# Altium PCB NB3000XN.PcbDoc (part 44 of 71)
Units mil, origin at the board's own origin, x right, y up, seen from the top; angles counter-clockwise.
Board outline 9527.56 x 6929.77 mil, 6 copper layers (Top Layer, GND+SHIELD, MidLayer1, MidLayer2, P2 - 3V3+5V0, Bottom Layer), stack 62.375 mil thick; 832 components, 1027 nets, 4655 pads, 4981 vias.
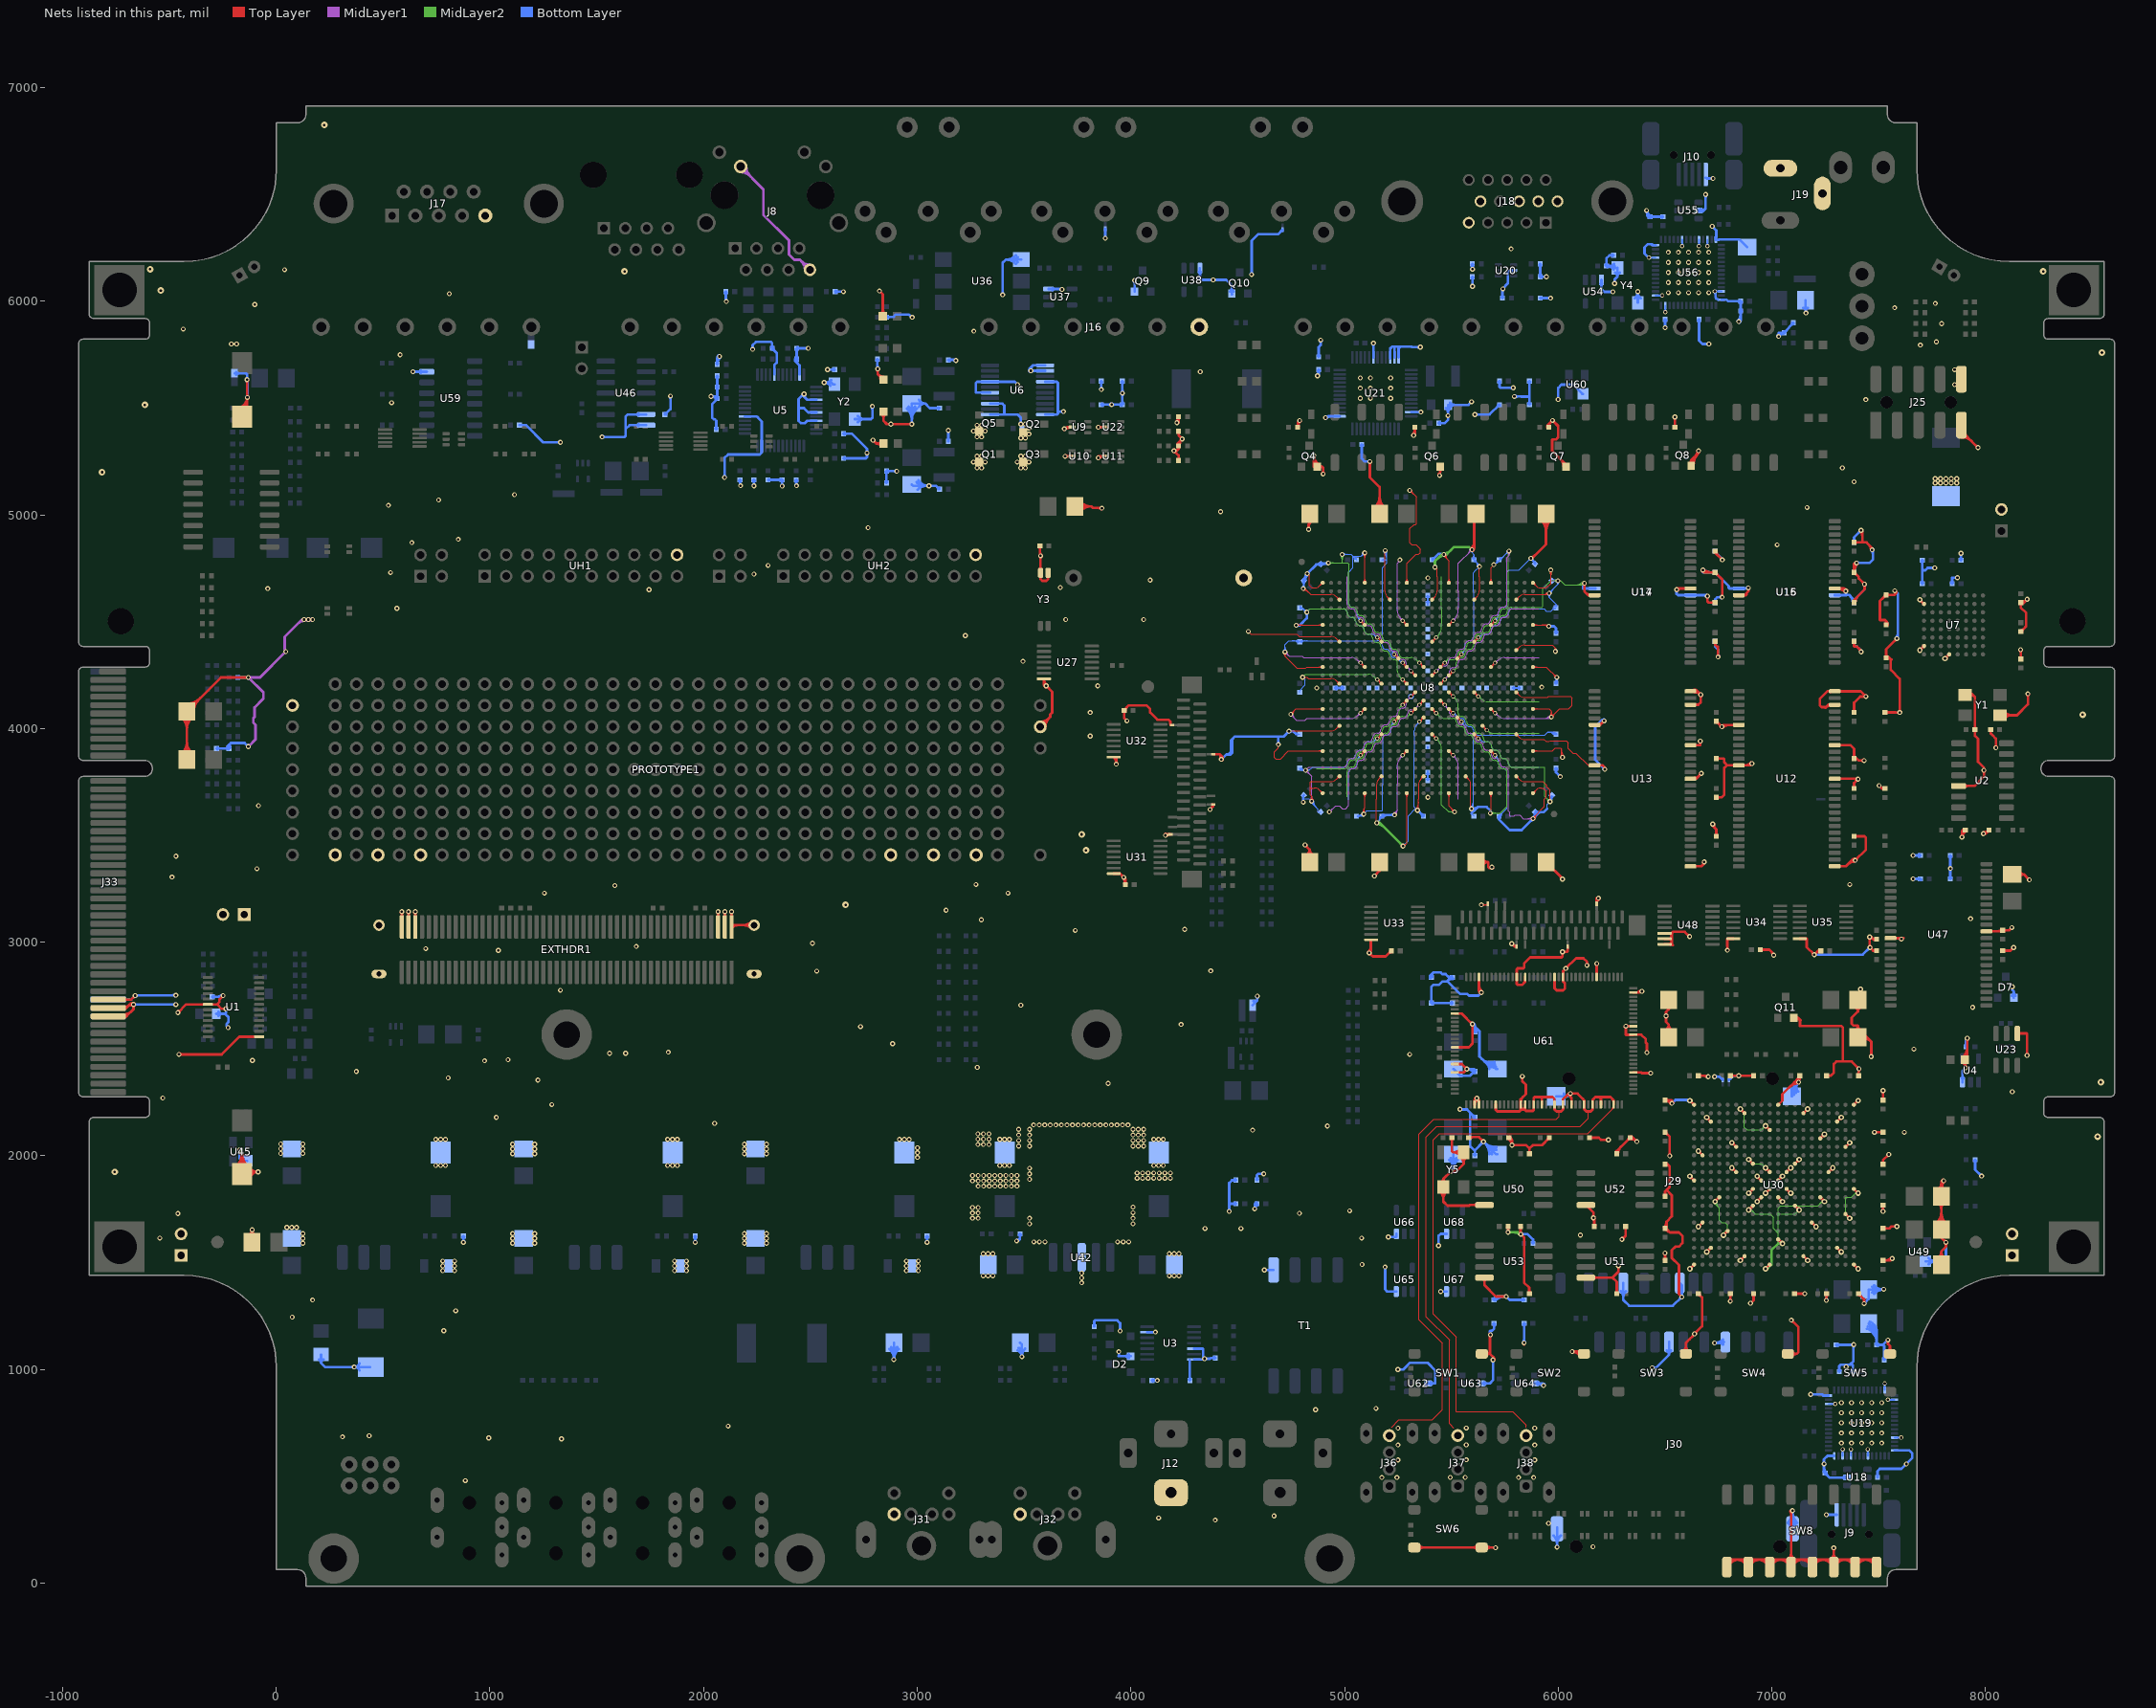
[diagram p48: the nets of this part, all layers, seen from the top]

## Via types
v1: diameter 23, hole 11.81, Top Layer to Bottom Layer, 3672 vias
v2: diameter 26, hole 11.81, Top Layer to Bottom Layer, 461 vias
v3: diameter 19, hole 11.81, Top Layer to Bottom Layer, tented both sides, 396 vias
v4: diameter 23.62, hole 11.81, Top Layer to Bottom Layer, 288 vias
v5: diameter 20, hole 11.81, Top Layer to Bottom Layer, 91 vias
v6: diameter 23, hole 11.81, Top Layer to Bottom Layer, tented both sides, 50 vias
v7: diameter 31, hole 11.81, Top Layer to Bottom Layer, 15 vias
v8: diameter 27.56, hole 11.81, Top Layer to Bottom Layer, tented both sides, 4 vias
v9: diameter 29, hole 11.81, Top Layer to Bottom Layer, 3 vias
v10: diameter 21, hole 11.81, Top Layer to Bottom Layer, 1 vias

## Nets (pads, with @x,y where several pads share a name; then routed paths per layer and width w, separated by ;. In a path a pad name is that pad's centre, name@x,y a point inside that pad or via, vN(x,y) a via of type N, cw(c..) or ccw(c..) an arc to the next point about the centre after c; other vN are vias at no path point) (continued)
GND: (continued)
  Bottom Layer w4: v1@4714.47,4365.09 ccw(c4698.26,4381.31) 4721.19,4381.31 ccw(c4744.13,4381.31) v1@4727.91,4365.09 ; v1@4717.3,4362.26 ccw(c4707.91,4371.65) 4721.19,4371.65 ccw(c4734.47,4371.65) v1@4725.08,4362.26 ; v1(4721.19,4358.37) 4721.19,4391.95 4739.86,4410.62 C320.2@4790,4410.62 ; 4754.08,4410.62 cw(c4754.08,4369.63) C320.2@4783.06,4398.61 ; 4763.73,4410.62 cw(c4763.73,4379.28) C320.2@4785.89,4401.44 ; 4765.19,3982.78 4765.19,3983.04 ; 4773.39,4410.62 cw(c4773.39,4388.94) C320.2@4788.72,4404.27 ; C320.2@4778.55,4410.62 ccw(c4778.55,4417) C320.2@4783.06,4412.49 ; C323.2@4781.37,3969.77 ccw(c4773.52,3965.52) 4773.52,3974.45 ; C323.2@4781.37,3979.12 cw(c4773.52,3983.38) 4773.52,3974.45 ; C322.2@4787.93,3814.28 ccw(c4800.95,3818.83) C322.2@4800.95,3805.04 ; C322.2@4790,3815 C322.2@4799.96,3805.04 ; C323.2@4790,3974.45 4773.52,3974.45 ; C335.2@4790,4169.33 4790,4178.56 4815.19,4203.75 4815.19,4229.04 v1(4803.86,4240.37) ; C320.2@4790,4405.55 4795.07,4410.62 4860,4410.62 4870,4410.62 4938.04,4410.62 5153.78,4410.62 cw(c5153.78,4386.85) 5177.55,4386.85 ccw(c5193.15,4386.85) 5193.15,4371.25 cw(c5193.15,4347.48) 5216.92,4347.48 ; C304.2@4790,4559.19 cw(c4790,4513.22) v1@4822.51,4545.72 ; C304.2@4790,4563.19 cw(c4790,4526.87) v1@4815.68,4552.55 ; C304.2@4790,4565 4803.23,4565 v1(4823.52,4544.71) 4838.75,4559.93 4855.26,4559.93 4860,4559.93 4870,4559.93 4879.78,4559.93 4938.04,4559.93 4996.3,4559.93 cw(c4996.3,4544.33) 5011.9,4544.33 ccw(c5035.67,4544.33) 5035.67,4520.56 cw(c5035.67,4504.96) 5051.27,4504.96 ccw(c5075.04,4504.96) 5075.04,4481.19 cw(c5075.04,4465.59) 5090.64,4465.59 ccw(c5114.41,4465.59) 5114.41,4441.82 5122.53,4441.82 ; C304.2@4790,4567.19 cw(c4790,4540.53) 4808.85,4559.38 ; C304.2@4790,4571.19 cw(c4790,4554.19) 4802.02,4566.21 ; C320.2@4791.28,4404.27 cw(c4806.61,4388.94) 4806.61,4410.62 ; C322.2@4791.71,3815.6 ccw(c4806.58,3820.8) v1@4806.58,3805.04 ; C320.2@4794.11,4401.44 cw(c4816.27,4379.28) 4816.27,4410.62 ; C322.2@4795.49,3816.92 ccw(c4812.22,3822.77) v1@4812.22,3805.04 ; C320.2@4796.94,4398.61 cw(c4825.92,4369.63) 4825.92,4410.62 ; C320.2@4796.94,4412.49 ccw(c4801.45,4417) C320.2@4801.45,4410.62 ; C322.2@4799.26,3818.24 ccw(c4817.86,3824.74) v1(4817.86,3805.04) ; v1@4800.28,4661.72 ccw(c4777.82,4684.18) C310.2@4809.59,4684.18 ; C310.2@4802.65,4684.73 cw(c4785.9,4667.98) 4809.59,4667.98 cw(c4833.27,4667.99) C310.2@4816.53,4684.73 ; v1@4803.11,4658.89 ccw(c4787.47,4674.53) 4809.59,4674.53 ; C310.2@4805.48,4687.56 cw(c4795.56,4677.64) 4809.59,4677.64 cw(c4823.62,4677.64) C310.2@4813.7,4687.56 ; C327.2@4809.59,3688.33 4809.59,3672.04 4834.19,3672.04 v1(4846.19,3660.04) 4846.19,3651.71 4875.19,3622.71 4875.19,3609.59 C326.2@4888.33,3609.59 ; v1@4809.59,4659.98 C310.2@4809.59,4691.67 ; 4809.59,4671.69 ccw(c4823.69,4671.69) v1@4813.72,4661.72 ; v1@4809.99,3799.72 ccw(c4799.96,3792.93) C322.2@4799.96,3805.04 ; v1@4809.99,3810.36 cw(c4799.96,3817.15) C322.2@4799.96,3805.04 ; v1@4814.02,4544.71 ccw(c4791.09,4544.71) 4807.31,4560.93 ccw(c4823.52,4577.14) v1@4823.52,4554.21 ; v1@4817.52,4717.37 v1(4825.19,4725.04) ; v1@4817.86,3813.37 v1(4817.86,3805.04) ; v1@4818.02,4544.71 ccw(c4804.75,4544.71) 4814.14,4554.1 ccw(c4823.52,4563.49) v1@4823.52,4550.21 ; v1@4825.92,3800.02 cw(c4834.97,3794.38) 4834.97,3805.04 ; v1@4825.92,3810.07 ccw(c4834.97,3815.71) 4834.97,3805.04 ; v1@4847.69,3660.04 ccw(c4871.43,3660.04) 4854.64,3643.25 ; v1@4851.69,3660.04 ccw(c4885.09,3660.04) 4861.47,3636.43 ; v1@4855.69,3660.04 ccw(c4898.74,3660.04) 4868.3,3629.6 ; v1(4988.86,4815.04) 5031.3,4815.04 5040.19,4806.15 ; v1@4992.75,4811.15 cw(c5002.14,4801.76) 5002.14,4815.04 cw(c5002.14,4828.32) v1@4992.75,4818.93 ; v1@4995.57,4808.32 cw(c5011.79,4792.11) 5011.79,4815.04 cw(c5011.79,4837.98) v1@4995.57,4821.76 ; 5020.07,3670 5020.07,3679.78 5020.07,3738.04 5020.07,3796.3 cw(c5035.67,3796.3) 5035.67,3811.9 ccw(c5035.67,3835.67) 5059.44,3835.67 5059.44,3843.79 ; 5020.07,4700.22 5020.07,4670 ; 5020.07,4724.74 5020.07,4732.25 ; C308.2@5046.53,4790.26 ccw(c5024.87,4790.82) 5040.19,4806.15 ; C308.2@5050.53,4790.15 ccw(c5037.7,4790.49) 5046.77,4799.56 ccw(c5055.85,4808.64) C308.2@5056.19,4795.81 ; C308.2@5056.08,4799.81 cw(c5055.51,4821.47) 5040.19,4806.15 ; C308.2@5056.34,4790 5040.19,4806.15 ; 5059.44,4536.21 5059.44,4544.33 ccw(c5035.67,4544.33) 5035.67,4568.1 cw(c5035.67,4583.7) 5020.07,4583.7 5020.07,4641.96 5020.07,4670 ; 5059.49,3843.84 cw(c5083.21,3845.45) 5064.61,3860.24 ; 5059.49,4536.16 ccw(c5083.21,4534.55) 5064.61,4519.76 ; C331.2@5060.45,3585.89 cw(c5070.37,3575.97) 5070.37,3590 cw(c5070.37,3604.03) C331.2@5060.45,3594.11 ; C331.2@5063.28,3583.06 cw(c5080.02,3566.32) 5080.02,3590 cw(c5080.03,3613.69) C331.2@5063.28,3596.94 ; C331.2@5063.27,3590 ccw(c5063.27,3615.59) v1@5085.43,3602.79 ; v3@5067.65,3873.74 cw(c5049.82,3870.59) 5064.65,3860.21 cw(c5079.49,3849.82) v3@5076.34,3867.65 ; v3@5067.65,4506.26 ccw(c5049.82,4509.41) 5064.65,4519.79 ccw(c5079.49,4530.18) v3@5076.34,4512.35 ; 5070.2,3590 ccw(c5070.2,3611.59) v1@5088.89,3600.79 ; 5077.13,3590 ccw(c5077.13,3607.58) v1@5092.36,3598.79 ; v1@5081.96,3604.79 cw(c5056.34,3619.59) C331.2@5056.34,3590 5088.48,3590 5090.19,3591.71 v1(5090.19,3600.04) 5105.15,3615 5175,3615 5177.55,3617.55 5177.55,3655.26 5177.55,3660 5177.55,3670 5177.55,3679.78 5177.55,3738.04 5177.55,3953.78 cw(c5193.15,3953.78) 5193.15,3969.38 ccw(c5193.15,3993.15) 5216.92,3993.15 5216.92,4001.27 ; 5084.06,3590 ccw(c5084.06,3603.58) v1@5095.82,3596.79 ; v1@5085.02,4822.37 cw(c5062.09,4822.37) 5078.31,4806.16 cw(c5094.52,4789.94) v1@5094.52,4812.87 ; v1@5089.02,4822.37 cw(c5075.75,4822.37) 5085.14,4812.99 cw(c5094.52,4803.6) v1@5094.52,4816.87 ; v1(5094.52,4822.37) 5078.3,4806.15 5040.19,4806.15 ; 5122.53,3938.18 5114.41,3938.18 ccw(c5114.41,3914.41) 5090.64,3914.41 cw(c5075.04,3914.41) 5075.04,3898.81 ccw(c5075.04,3875.04) 5051.27,3875.04 cw(c5035.67,3875.04) 5035.67,3859.44 ccw(c5035.67,3835.67) 5011.9,3835.67 cw(c4996.3,3835.67) 4996.3,3820.07 4938.04,3820.07 4879.78,3820.07 4870,3820.07 4860,3820.07 4855.26,3820.07 4850,3820.07 4834.97,3805.04 ; 5122.58,3938.23 ccw(c5124.19,3961.95) 5138.98,3943.35 ; 5122.58,4441.77 cw(c5124.19,4418.05) 5138.98,4436.65 ; v3@5146.39,3955.08 cw(c5128.56,3958.23) 5138.95,3943.39 cw(c5149.33,3928.56) v3@5152.48,3946.39 ; v3@5146.39,4424.92 ccw(c5128.56,4421.77) 5138.95,4436.61 ccw(c5149.33,4451.44) v3@5152.48,4433.61 ; v1(5150.86,3558.37) 5178.47,3585.98 5181.86,3589.37 5181.86,3590 C330.2@5174.45,3590 ; v1@5150.86,3563.87 ccw(c5150.86,3577.15) 5160.25,3567.76 ccw(c5169.64,3558.37) v1@5156.36,3558.37 ; v1@5150.86,3567.87 ccw(c5150.86,3590.81) 5167.07,3574.59 ; C298.2@5151.81,4190 C298.2@5153.78,4191.97 ; v1@5154.88,3562.39 ccw(c5130.94,3586.33) C330.2@5164.67,3589.18 ; v1@5160.36,3558.37 cw(c5183.29,3558.37) 5167.07,3574.59 ; 5160.97,3568.48 ccw(c5142.17,3587.28) C330.2@5168.66,3589.51 ; C330.2@5172.64,3589.85 cw(c5153.41,3588.23) 5167.06,3574.57 ; C292.2@5174.45,4790 5198.52,4790 ; C292.2@5178.56,4785.89 cw(c5188.48,4775.97) 5188.48,4790 cw(c5188.48,4804.03) C292.2@5178.56,4794.11 ; C292.2@5181.39,4783.06 cw(c5198.13,4766.31) 5198.13,4790 cw(c5198.13,4813.69) C292.2@5181.39,4796.94 ; v1@5183.47,4826.66 cw(c5147.14,4790.32) 5198.52,4790.32 ; v1@5186.3,4829.49 cw(c5156.79,4799.98) 5198.52,4799.98 ; v1@5189.13,4832.31 cw(c5166.45,4809.63) 5198.52,4809.63 ; v1(5190.19,4833.37) 5198.52,4825.04 5198.52,4790 ; v1@5191.96,4835.14 cw(c5176.11,4819.29) 5198.52,4819.29 ; 5216.92,4378.73 5216.92,4386.85 ccw(c5193.15,4386.85) 5193.15,4410.62 cw(c5193.15,4426.22) 5177.55,4426.22 5177.55,4641.96 5177.55,4700.22 5177.55,4710 5177.55,4720 5177.55,4724.74 5177.55,4754.07 5198.52,4775.04 5198.52,4790 ; 5216.97,4001.32 cw(c5240.69,4002.93) 5222.09,4017.72 ; 5216.97,4378.68 ccw(c5240.69,4377.07) 5222.09,4362.28 ; v3@5225.13,4031.22 cw(c5207.3,4028.07) 5222.13,4017.69 cw(c5236.97,4007.3) v3@5233.82,4025.13 ; v3@5225.13,4348.78 ccw(c5207.3,4351.93) 5222.13,4362.31 ccw(c5236.97,4372.7) v3@5233.82,4354.87 ; v3@5264.5,4306.81 ccw(c5246.67,4303.66) 5257.06,4318.5 ; v3@5270.59,4315.5 cw(c5267.44,4333.33) 5257.06,4318.5 ; v1(5273.52,3450.04) 5298.52,3475.04 5298.52,3591.71 5333.19,3626.37 ; v1@5273.52,3455.54 ccw(c5273.52,3468.82) 5282.91,3459.43 ccw(c5292.3,3450.04) v1@5279.02,3450.04 ; v1@5273.52,3459.54 ccw(c5273.52,3482.48) 5289.74,3466.26 ccw(c5305.96,3450.04) v1@5283.02,3450.04 ; v1(5341.52,3618.04) 5326.77,3632.8 5326.77,3655.26 5326.77,3660 5326.77,3670 5326.77,3876.1 5326.77,3895.52 5326.77,3969.64 5326.77,3989.14 cw(c5368.5,3989.14) 5338.99,4018.65 ; v3@5343.16,4031.87 cw(c5325.12,4030.29) 5338.99,4018.65 ; v3@5351.28,4025.05 ccw(c5352.86,4007.01) 5338.99,4018.65 ; C333.2@5365.19,3590 C333.2@5365.19,3594.37 ; v3@5509.41,4064.5 cw(c5512.56,4046.67) 5522.94,4061.5 ; v3@5515.5,4073.19 ccw(c5533.33,4076.34) 5522.94,4061.5 ; v3@5546.18,4025.13 cw(c5543.03,4007.3) 5557.87,4017.69 cw(c5572.7,4028.07) v3@5554.87,4031.22 ; v3@5546.18,4354.87 ccw(c5543.03,4372.7) 5557.87,4362.31 ccw(c5572.7,4351.93) v3@5554.87,4348.78 ; 5557.91,4017.72 cw(c5539.31,4002.93) 5563.03,4001.32 ; 5557.91,4362.28 ccw(c5539.31,4377.07) 5563.03,4378.68 ; 5563.08,4001.27 5563.08,3993.15 ccw(c5586.85,3993.15) 5586.85,3969.38 cw(c5586.85,3953.78) 5602.45,3953.78 5602.45,3738.04 5602.45,3679.78 5602.45,3670 5602.45,3660 5602.45,3655.26 ; 5563.08,4378.73 5563.08,4386.85 cw(c5586.85,4386.85) 5586.85,4410.62 ccw(c5586.85,4426.22) 5602.45,4426.22 5602.45,4641.96 5602.45,4700.22 5602.45,4710 5602.45,4720 5602.45,4728.97 5610.52,4737.04 v1(5631.86,4758.37) 5631.86,4763.69 C291.2@5605.55,4790 5605.55,4814.04 v1@5593.55,4826.04 ; v1@5589.49,3632.96 ccw(c5576.8,3655.26) 5602.45,3655.26 ; v1@5591.47,3629.49 ccw(c5580.71,3648.38) 5602.45,3648.38 ; v1@5593.45,3626.01 ccw(c5584.63,3641.5) 5602.45,3641.5 ; v1@5593.52,4826.04 5596.19,4828.71 v1(5596.19,4837.04) ; 5594.19,3603.07 5605.55,3591.71 C328.2@5605.55,3590 ; v1(5594.19,3624.71) v1@5602.45,3624.71 ; v1@5595.43,3622.54 ccw(c5588.55,3634.62) 5602.45,3634.62 ; C291.2@5598.61,4796.94 ccw(c5581.86,4813.69) 5605.55,4813.69 ccw(c5629.24,4813.68) C291.2@5612.49,4796.94 ; C291.2@5601.44,4794.11 ccw(c5591.52,4804.03) 5605.55,4804.03 ccw(c5619.58,4804.03) C291.2@5609.66,4794.11 ; C291.2@5605.55,4780.19 cw(c5605.55,4756.5) 5622.3,4773.25 cw(c5639.05,4790) C291.2@5615.36,4790 ; C291.2@5605.55,4784.19 cw(c5605.55,4770.16) 5615.47,4780.08 cw(c5625.39,4790) C291.2@5611.36,4790 ; 5606.86,3616.04 5606.86,3617.37 5602.45,3621.78 v1@5602.45,3624.71 ; C291.2@5611.88,4783.67 cw(c5586.58,4758.38) v1@5622.36,4758.38 ; 5618.71,4776.84 cw(c5600.24,4758.38) v1@5626.36,4758.37 ; 5624.72,4770.83 ccw(c5631.86,4777.97) v1@5631.86,4767.87 ; 5625.54,4770.02 cw(c5613.89,4758.38) v1@5630.36,4758.37 ; C296.2@5626.22,4188.03 C296.2@5628.19,4190 ; v3@5627.52,3946.39 cw(c5630.67,3928.56) 5641.05,3943.39 cw(c5651.44,3958.23) v3@5633.61,3955.08 ; v3@5627.52,4433.61 ccw(c5630.67,4451.44) 5641.05,4436.61 ccw(c5651.44,4421.77) v3@5633.61,4424.92 ; 5641.02,3943.35 ccw(c5655.81,3961.95) 5657.42,3938.23 ; 5641.02,4436.65 cw(c5655.81,4418.05) 5657.42,4441.77 ; 5657.47,3938.18 5665.59,3938.18 cw(c5665.59,3914.41) 5689.36,3914.41 ccw(c5704.96,3914.41) 5704.96,3898.81 cw(c5704.96,3875.04) 5728.73,3875.04 ccw(c5744.33,3875.04) 5744.33,3859.44 cw(c5744.33,3835.67) 5768.1,3835.67 ccw(c5783.7,3835.67) 5783.7,3820.07 5841.96,3820.07 5900.22,3820.07 5910,3820.07 ; 5657.47,4441.82 5665.59,4441.82 ccw(c5665.59,4465.59) 5689.36,4465.59 cw(c5704.96,4465.59) 5704.96,4481.19 ccw(c5704.96,4504.96) 5728.73,4504.96 cw(c5744.33,4504.96) 5744.33,4520.56 ccw(c5744.33,4544.33) 5768.1,4544.33 cw(c5783.7,4544.33) 5783.7,4559.93 5841.96,4559.93 5910,4559.93 5920,4559.93 5935.11,4559.93 5945,4550.04 5966.83,4550.04 ; C312.2@5665.59,4190 C312.2@5674.82,4190 ; v1(5698.52,4767.37) 5701.19,4767.37 5706.19,4772.37 5706.19,4772.53 5710.04,4776.37 ; v3@5703.66,3867.65 cw(c5700.51,3849.82) 5715.35,3860.21 cw(c5730.18,3870.59) v3@5712.35,3873.74 ; v3@5703.66,4512.35 ccw(c5700.51,4530.18) 5715.35,4519.79 ccw(c5730.18,4509.41) v3@5712.35,4506.26 ; C307.2@5713.97,4788.47 cw(c5700.13,4786.28) 5710.04,4776.38 ; 5715.39,3860.24 cw(c5696.79,3845.45) 5720.51,3843.84 ; 5715.39,4519.76 ccw(c5696.79,4534.55) 5720.51,4536.16 ; C307.2@5717.77,4778.95 cw(c5721.24,4775.48) C307.2@5722.05,4780.32 ; 5720.56,3843.79 5720.56,3835.67 ccw(c5744.33,3835.67) 5744.33,3811.9 cw(c5744.33,3796.3) 5759.93,3796.3 5759.93,3738.04 5759.93,3695 ; 5720.56,4536.21 5720.56,4544.33 cw(c5744.33,4544.33) 5744.33,4568.1 ccw(c5744.33,4583.7) 5759.93,4583.7 5759.93,4641.96 5759.93,4700.22 5759.93,4710 5759.93,4720 5759.93,4724.74 5759.93,4733.37 5768.26,4741.71 5816.86,4741.71 v1(5872.19,4797.04) ; C307.2@5722.13,4780.31 ccw(c5719.95,4766.47) 5710.04,4776.38 ; C329.2@5723.66,3590 C329.2@5731.86,3598.2 ; C329.2@5723.66,3595.81 ccw(c5723.66,3609.84) 5733.58,3599.92 ccw(c5743.5,3590) C329.2@5729.47,3590 ; C329.2@5723.66,3599.81 ccw(c5723.66,3623.5) 5740.41,3606.75 ccw(c5757.16,3590) C329.2@5733.47,3590 ; C307.2@5723.66,4790 5710.04,4776.37 ; C307.2@5723.66,4791.81 ccw(c5723.66,4808.62) 5735.55,4796.74 ; C307.2@5723.66,4795.81 ccw(c5723.66,4822.28) 5742.38,4803.56 ; C307.2@5723.66,4799.81 ccw(c5723.66,4835.94) 5749.21,4810.39 ; C329.2@5731.86,3590 C329.2@5731.86,3598.2 ; C307.2@5733.47,4790 cw(c5744.72,4790) 5736.77,4797.95 ; v1@5760.36,4831.04 cw(c5737.42,4831.04) 5753.64,4814.82 cw(c5769.86,4798.61) v1@5769.86,4821.54 ; v1@5764.36,4831.04 cw(c5751.08,4831.04) 5760.47,4821.65 cw(c5769.86,4812.26) v1@5769.86,4825.54 ; v1(5769.86,4831.04) 5726.24,4787.42 5715.19,4776.37 5710.04,4776.37 ; v1@5878.02,3586.74 ccw(c5865.73,3609.59) C324.2@5891.67,3609.59 5891.67,3587.52 ; v1@5879.92,3583.22 ccw(c5869.33,3602.89) C324.2@5891.67,3602.89 ; v1@5881.81,3579.7 ccw(c5872.93,3596.2) C324.2@5891.67,3596.2 ; v1(5882.52,3578.37) 5891.67,3587.52 ; v1@5883.71,3576.17 ccw(c5876.54,3589.5) 5891.67,3589.5 ; C324.2@5885.1,3602.3 cw(c5871.77,3587.52) 5891.67,3587.52 ; C324.2@5887.78,3605.27 cw(c5879.88,3596.52) 5891.67,3596.52 cw(c5903.46,3596.52) C324.2@5895.56,3605.27 ; C324.2@5898.24,3602.3 ccw(c5911.58,3587.52) 5891.67,3587.52 ; 5948.52,3625.04 5948.52,3645.37 v1(5961.52,3658.37) 5970.41,3667.26 ; v1@5951.97,4625.92 cw(c5942.4,4613.78) 5957.86,4613.78 ; v1@5957.23,3666.85 ccw(c5946.33,3688.33) C325.2@5970.41,3688.33 5970.41,3667.26 ; v1@5957.86,4638.87 ccw(c5957.86,4652.15) 5967.25,4642.76 ccw(c5976.64,4633.37) v1@5963.36,4633.37 ; v1@5957.86,4642.87 ccw(c5957.86,4665.81) 5974.07,4649.59 ccw(c5990.29,4633.37) v1@5967.36,4633.37 ; v1@5959.04,3663.28 ccw(c5949.63,3681.81) C325.2@5970.41,3681.81 ; 5959.48,3983.37 cw(c5959.48,3950.21) C305.2@5985.45,3970.83 ; v1@5960.85,3659.71 ccw(c5952.94,3675.3) C325.2@5970.41,3675.3 ; v1@5962.66,3656.15 ccw(c5956.24,3668.78) 5970.41,3668.78 ; v1@5963.74,4625.92 ccw(c5973.32,4613.78) 5957.86,4613.78 ; C325.2@5964.1,3680.82 cw(c5952.71,3667.26) 5970.41,3667.26 ; C325.2@5966.67,3683.88 cw(c5959.93,3675.85) 5970.41,3675.85 cw(c5980.9,3675.85) C325.2@5974.15,3683.88 ; 5967.45,4550.66 5966.9,4550.11 ; 5967.76,3983.37 cw(c5967.76,3956.79) C305.2@5988.58,3973.32 ; 5970.27,4553.27 cw(c5985.48,4538.05) C303.2@5989.04,4559.27 ; C309.2@5970.41,4691.67 v1(5998.52,4691.71) v1(5998.52,4691.71) 5998.52,4674.04 ; C309.2@5974.52,4687.56 cw(c5984.44,4677.64) 5984.44,4691.67 cw(c5984.44,4705.7) C309.2@5974.52,4695.78 ; C309.2@5975.5,4691.67 ccw(c5975.5,4714.73) v1@5991.81,4698.43 ; C309.2@5975.68,4691.67 cw(c5975.68,4668.86) v1@5991.81,4684.99 ; 5975.75,4558.75 cw(c5987.05,4547.45) C303.2@5989.7,4563.21 ; 5976.05,3983.37 cw(c5976.05,3963.37) C305.2@5991.71,3975.81 ; C325.2@5976.73,3680.82 ccw(c5988.12,3667.27) 5970.41,3667.27 ; C309.2@5977.35,4684.73 cw(c5994.1,4667.99) v1@5994.1,4691.67 ; C309.2@5977.35,4698.61 ccw(c5994.1,4715.36) v1@5994.1,4691.67 ; C305.2@5982.32,3968.35 ccw(c5951.19,3943.63) 5951.19,3983.37 ; C309.2@5985.16,4691.67 ccw(c5985.16,4705.07) v1@5994.64,4695.6 ; C303.2@5985.25,4573.59 ccw(c5980.8,4581.64) 5990,4581.64 ; C309.2@5985.33,4691.67 cw(c5985.33,4678.52) v1@5994.64,4687.82 ; C303.2@5990,4565 5990,4581.64 ; C305.2@5990.19,3974.71 5981.52,3983.37 5951.19,3983.37 ; v1@5993.29,4683.78 cw(c5986.85,4674.04) 5998.52,4674.04 ; C303.2@5994.75,4573.59 cw(c5999.2,4581.64) 5990,4581.64 ; v1@6003.76,4683.78 ccw(c6010.2,4674.04) 5998.52,4674.04 ; 6115.19,4655.37 cw(c6133.18,4655.37) v1@6126.21,4671.95 ; 6115.19,4661.39 cw(c6130.65,4661.39) v1@6124.66,4675.64 ; 6115.19,4667.41 cw(c6128.12,4667.41) v1@6123.11,4679.33 ; 6115.9,4655.75 6115.19,4656.45 6115.19,4673.37 v1(6122.52,4680.71) ; 6131.86,4655.75 6170,4655.75 U14.34@6170.59,4655.75 ; U14.34@6147.37,4650.09 ccw(c6133.72,4636.43) 6133.72,4655.75 ccw(c6133.72,4675.06) U14.34@6147.37,4661.4 ; C322.2@4799.96,3805.04 v1(4817.86,3805.04) ; v1(4817.86,3805.04) 4834.97,3805.04 ; 5020.07,4670 5020.07,4710 5020.07,4720 5020.07,4732.25 ; 5020.07,4732.25 5020.07,4732.37 5020.19,4732.37 ; 5020.07,4732.25 5020.19,4732.37 ; 5020.19,4732.37 5040.19,4752.37 5040.19,4806.15 ; 5216.92,4347.48 ccw(c5232.52,4347.48) 5232.52,4331.88 ; 5216.92,4347.48 ccw(c5232.52,4347.48) 5232.52,4331.88 ; 5232.52,4331.88 cw(c5232.52,4308.11) 5249.33,4324.92 5257.06,4318.5 ; 5522.94,4061.5 5530.67,4055.08 ccw(c5547.48,4071.89) 5547.48,4048.12 ; 5547.48,4048.12 cw(c5547.48,4032.52) 5563.08,4032.52 ; 5547.48,4048.12 cw(c5547.48,4032.52) 5563.08,4032.52 ; 5563.08,4032.52 ccw(c5586.85,4032.52) 5586.85,4008.75 cw(c5586.85,3993.15) 5602.45,3993.15 ccw(c5626.22,3993.15) 5626.22,3969.38 5841.96,3969.38 5910,3969.38 5920,3969.38 5937.19,3969.38 5951.19,3983.37 ; v1@5602.45,3624.71 v1@5602.45,3624.78 ; v1@5602.45,3624.71 5602.52,3624.71 v1@5602.45,3624.78 ; v1@5602.45,3624.78 5602.45,3655.26 ; C329.2@5731.86,3598.2 5759.93,3626.27 5759.93,3660 5759.93,3670 ; 5759.93,3670 5759.93,3679.78 5759.93,3695 ; 5759.93,3670 5759.93,3695 ; 5957.86,4613.78 5990,4581.64 ; 5957.86,4613.78 v1(5957.86,4633.37) 5998.52,4674.04 ; 5966.83,4550.04 5966.9,4550.04 5966.9,4550.11 ; 5966.83,4550.04 5966.9,4550.11 ; 5966.9,4550.11 5968.57,4551.78 5968.78,4551.78 5976.78,4559.78 5976.78,4568.41 5990,4581.64
  Bottom Layer w5: C274.2@5388.03,4032.52 C274.2@5390,4030.55 ; C270.2@5388.03,4111.26 C270.2@5390,4109.29 ; v3(5508.11,4150.63) v3@5510.08,4150.63
  Bottom Layer w8: v3@5269.92,4229.37 v3(5271.89,4229.37) ; v3@5309.29,4152.6 v3(5311.26,4150.63) ; C317.2@5384.48,3762.45 ccw(c5371.14,3775.79) 5390,3775.79 ccw(c5408.86,3775.79) C317.2@5395.52,3762.45 ; C301.2@5384.48,3788.81 cw(c5371.14,3775.47) 5390,3775.47 cw(c5408.86,3775.47) C301.2@5395.52,3788.81 ; C299.2@5384.48,4591.19 ccw(c5371.14,4604.53) 5390,4604.53 ccw(c5408.86,4604.53) C299.2@5395.52,4591.19 ; C315.2@5384.48,4617.55 cw(c5371.14,4604.21) 5390,4604.21 cw(c5408.86,4604.21) C315.2@5395.52,4617.55 ; C317.2@5390,3756.93 C301.2@5390,3794.33 C301.2@5390,3800.73 ; C313.2@5390,3908.01 C313.2@5390,3914.41 ; C272.2@5390,4347.48 C272.2@5390,4349.45 ; C299.2@5390,4579.27 C299.2@5390,4585.67 C315.2@5390,4623.07 ; v3@5427.4,3951.81 v3(5429.37,3953.78) ; v3@5427.4,4270.71 v3(5429.37,4268.74) ; v3@5427.4,4428.19 v3(5429.37,4426.22) ; C300.2@5785.67,4190 C316.2@5823.07,4190 ; C300.2@5791.19,4184.48 cw(c5804.53,4171.14) 5804.53,4190 cw(c5804.53,4208.86) C300.2@5791.19,4195.52 ; C316.2@5817.55,4184.48 ccw(c5804.21,4171.14) 5804.21,4190 ccw(c5804.21,4208.86) C316.2@5817.55,4195.52 ; v5(6424.34,6203.9) U56.53@6455.67,6203.9 ; v5@6428.58,6199.66 cw(c6438.82,6189.41) 6438.82,6203.9 cw(c6438.82,6218.38) v5@6428.58,6208.14 ; U56.44@6455.67,6026.73 v5(6487,6026.73) ; v5@6482.76,6022.49 ccw(c6472.51,6012.25) 6472.51,6026.73 ccw(c6472.51,6041.22) v5@6482.76,6030.97 ; v5@6497.49,5953.58 ccw(c6487.25,5963.82) 6501.73,5963.82 ccw(c6516.22,5963.82) v5@6505.97,5953.58 ; v5(6501.73,5949.34) U56.41@6501.73,5980.67 ; v5@6576.23,6262.24 ccw(c6565.99,6272.49) 6580.47,6272.49 ccw(c6594.96,6272.49) v5@6584.72,6262.24 ; v5(6580.47,6258) U56.6@6580.47,6289.33 ; v5@6654.97,6262.24 ccw(c6644.73,6272.49) 6659.21,6272.49 ccw(c6673.7,6272.49) v5@6663.46,6262.24 ; v5(6659.21,6258) U56.10@6659.21,6289.33 ; v5@6694.34,6262.24 ccw(c6684.1,6272.49) 6698.58,6272.49 ccw(c6713.07,6272.49) v5@6702.83,6262.24 ; v5(6698.58,6258) U56.12@6698.58,6289.33 ; v5(6733,6046.42) U56.26@6764.33,6046.42 ; v5@6737.24,6042.17 cw(c6747.48,6031.93) 6747.48,6046.42 cw(c6747.48,6060.9) v5@6737.24,6050.66 ; v5@7327.17,622.76 cw(c7316.93,612.51) 7331.42,612.51 cw(c7345.9,612.51) v5@7335.66,622.76 ; U19.12@7331.42,595.67 v5(7331.42,627) ; v5@7366.54,622.76 cw(c7356.3,612.51) 7370.79,612.51 cw(c7385.27,612.51) v5@7375.03,622.76 ; U19.10@7370.79,595.67 v5(7370.79,627) ; v5@7445.28,622.76 cw(c7435.04,612.51) 7449.53,612.51 cw(c7464.01,612.51) v5@7453.77,622.76 ; U19.6@7449.53,595.67 v5(7449.53,627) ; v5@7524.03,931.42 cw(c7513.78,921.18) 7528.27,921.18 cw(c7542.75,921.18) v5@7532.51,931.42 ; U19.41@7528.27,904.33 v5@7528.27,935.37 ; v5(7543,858.27) U19.44@7574.33,858.27 ; v5@7547.24,854.03 cw(c7557.48,843.78) 7557.48,858.27 cw(c7557.49,872.75) v5@7547.24,862.51 ; U19.53@7574.33,681.1 v5(7605.66,681.1) ; v5@7601.42,676.86 ccw(c7591.18,666.62) 7591.18,681.1 ccw(c7591.18,695.59) v5@7601.42,685.34 ; U19.26@7282.52,838.58 cw(c7282.52,824.1) 7292.76,834.34 ccw(c7282.52,824.1) U19.26@7282.52,838.58 ; U19.26@7282.52,838.58 ccw(c7282.52,853.07) 7292.76,842.83 cw(c7282.52,853.07) U19.26@7282.52,838.58 ; U19.26@7265.67,838.58 v5(7297,838.58) U19.26@7265.67,838.58
  Bottom Layer w10: v3@5319.42,4150.63 ccw(c5311.26,4150.63) v3@5319.42,4150.63
  Bottom Layer w11.81: v1@6410.51,6421 cw(c6401.42,6408.8) 6416.63,6408.8 ; v1(6413.85,6425.49) v1@6416.63,6422.71 ; 6416.63,6406.14 ccw(c6433.61,6406.14) C166.2@6428.07,6390.09 ; v1@6419.02,6423.35 ccw(c6436.69,6416.03) C166.2@6423.16,6402.5 ; C166.2@6424.09,6395.67 ccw(c6409.84,6395.67) 6419.92,6405.75 ccw(c6430,6415.83) C166.2@6430,6401.57 ; v5(6424.34,6203.9) 6404.86,6223.37 6403.86,6224.37 6403.86,6252.71 6417.86,6266.71 6438.52,6266.71 6438.52,6262.95 U56.56@6455.67,6262.95 ; C166.2@6431.93,6401.25 cw(c6439.33,6422.7) v1@6416.63,6422.7 ; C166.2@6434.18,6391.49 cw(c6444.26,6381.41) 6444.26,6395.67 cw(c6444.26,6409.93) C166.2@6434.18,6399.85 ; 6435.45,6266.71 cw(c6435.45,6253.66) U56.56@6444.67,6262.89 ; C167.2@6485.82,6391.49 ccw(c6475.74,6381.41) 6475.74,6395.67 ccw(c6475.74,6409.93) C167.2@6485.82,6399.85 ; C167.2@6487.21,6398.46 C167.2@6490,6395.67 C166.2@6430,6395.67 6416.63,6409.04 v1@6416.63,6422.71 ; v1@6720.98,6345.32 cw(c6720.98,6331.81) 6730.53,6341.36 cw(c6740.09,6350.91) v1@6726.58,6350.91 ; v1(6720.98,6350.91) 6740.19,6331.71 6740.19,6300.35 6737.95,6300.35 U56.14@6737.95,6289.33 6737.95,6287.37 6751.52,6287.37 6753.48,6289.33 6848.66,6289.33 C175.2@6885,6252.99 ; U56.14@6737.89,6300.33 ccw(c6732.32,6305.89) U56.14@6740.19,6305.89 ; 6795,6000.04 6854.29,6000.04 C177.2@6854.33,6000 C176.2@6854.33,5955 6854.33,5914.33 v1(6845,5905) ; 6839.98,6000.04 cw(c6839.98,5985.64) 6850.15,5995.82 cw(c6840.07,5985.74) 6854.33,5985.74 cw(c6868.59,5985.74) C177.2@6858.51,5995.82 ; 6840.17,6000.04 ccw(c6840.17,6014.16) C177.2@6850.15,6004.18 ; v1@6841.04,5908.96 ccw(c6808.97,5941.03) 6854.33,5941.03 ; v1@6849.4,5900.6 ccw(c6837.48,5912.52) 6854.33,5912.52 ; C176.2@6850.15,5950.82 cw(c6840.07,5940.74) 6854.33,5940.74 cw(c6868.59,5940.74) C176.2@6858.51,5950.82 ; C176.2@6850.15,5959.18 ccw(c6840.07,5969.26) 6854.33,5969.26 ccw(c6868.59,5969.26) C176.2@6858.51,5959.18 ; v1@7025.47,5836.72 cw(c7044.54,5833.09) 7044.54,5852.5 ; v1@7027.62,5839.51 ccw(c7018.07,5849.06) 7031.58,5849.06 ccw(c7045.09,5849.06) v1@7035.54,5839.51 ; v1(7031.58,5835.56) 7031.58,5851.58 7032.5,5852.5 R246.2@7058.82,5852.5 ccw(c7058.82,5830.37) v1@7037.08,5834.51 ; R246.2@7054.99,5848.67 ccw(c7045.75,5839.43) 7045.75,5852.5 ccw(c7045.75,5865.57) R246.2@7054.99,5856.33 ; v1(7181.86,883.37) 7235,883.37 7240.2,878.17 U19.28@7265.45,878.17 ; v1@7185.81,879.42 cw(c7195.36,869.87) 7195.36,883.37 cw(c7195.36,896.88) v1@7185.81,887.33 ; C95.2@7300.67,1115 7381.86,1115 7381.86,1039.04 ; C95.2@7304.85,1110.82 cw(c7314.93,1100.74) 7314.93,1115 cw(c7314.93,1129.26) C95.2@7304.85,1119.18 ; 7365.89,1115 ccw(c7365.89,1134.34) v1@7379.57,1120.66 ; 7381.86,1099.18 cw(c7401.05,1099.18) v1@7387.48,1112.75 ; C89.2@7445.29,1190.82 cw(c7420.25,1125.01) C88.1@7490.67,1125.01 ; C89.2@7449.49,1201.86 cw(c7426.77,1142.14) 7490.67,1142.14 ; C89.2@7452.99,1215 7490.67,1177.32 C88.1@7490.67,1115 7520.15,1115 7521.86,1116.71 ; C89.2@7453.69,1212.9 cw(c7433.29,1159.27) 7490.67,1159.27 ; C89.2@7457.89,1223.94 cw(c7439.8,1176.4) C89.2@7490.67,1176.4 ; C88.1@7486.49,1119.18 ccw(c7476.41,1129.26) 7490.67,1129.26 ccw(c7504.93,1129.26) 7494.85,1119.18 ccw(c7504.93,1129.26) 7504.93,1115 ccw(c7504.93,1100.74) C88.1@7494.85,1110.82 ; R109.2@7522.35,1049.32 ccw(c7513.11,1058.56) 7526.18,1058.56 ccw(c7539.25,1058.56) R109.2@7530.01,1049.32 ; R109.2@7526.18,1045 7526.18,1110.68 7521.86,1115 7521.86,1116.71 ; v1@7537.93,1138.37 cw(c7524.42,1138.37) 7533.97,1128.82 cw(c7543.52,1119.27) v1@7543.52,1132.78 ; v1(7543.52,1138.37) 7521.86,1116.71 ; U19.56@7574.33,622.05 7574.93,621.45 7643.79,621.45 7656.86,608.37 ; U19.28@7265.45,878.17 U19.28@7265.67,877.95 U19.28@7265.45,878.17